# Altium PCB PCB_Main_Board_v2.0.PcbDoc (part 5 of 5)
Units mil, origin at the board's own origin, x right, y up, seen from the top; angles counter-clockwise.
Board outline 1967.5 x 1574.8 mil, 4 copper layers (Top Layer, Mid Layer 1, Mid Layer 2, Bottom Layer), stack 61.811 mil thick; 225 components, 129 nets, 854 pads, 286 vias.
Unrouted connection lines stored in the file: 2.
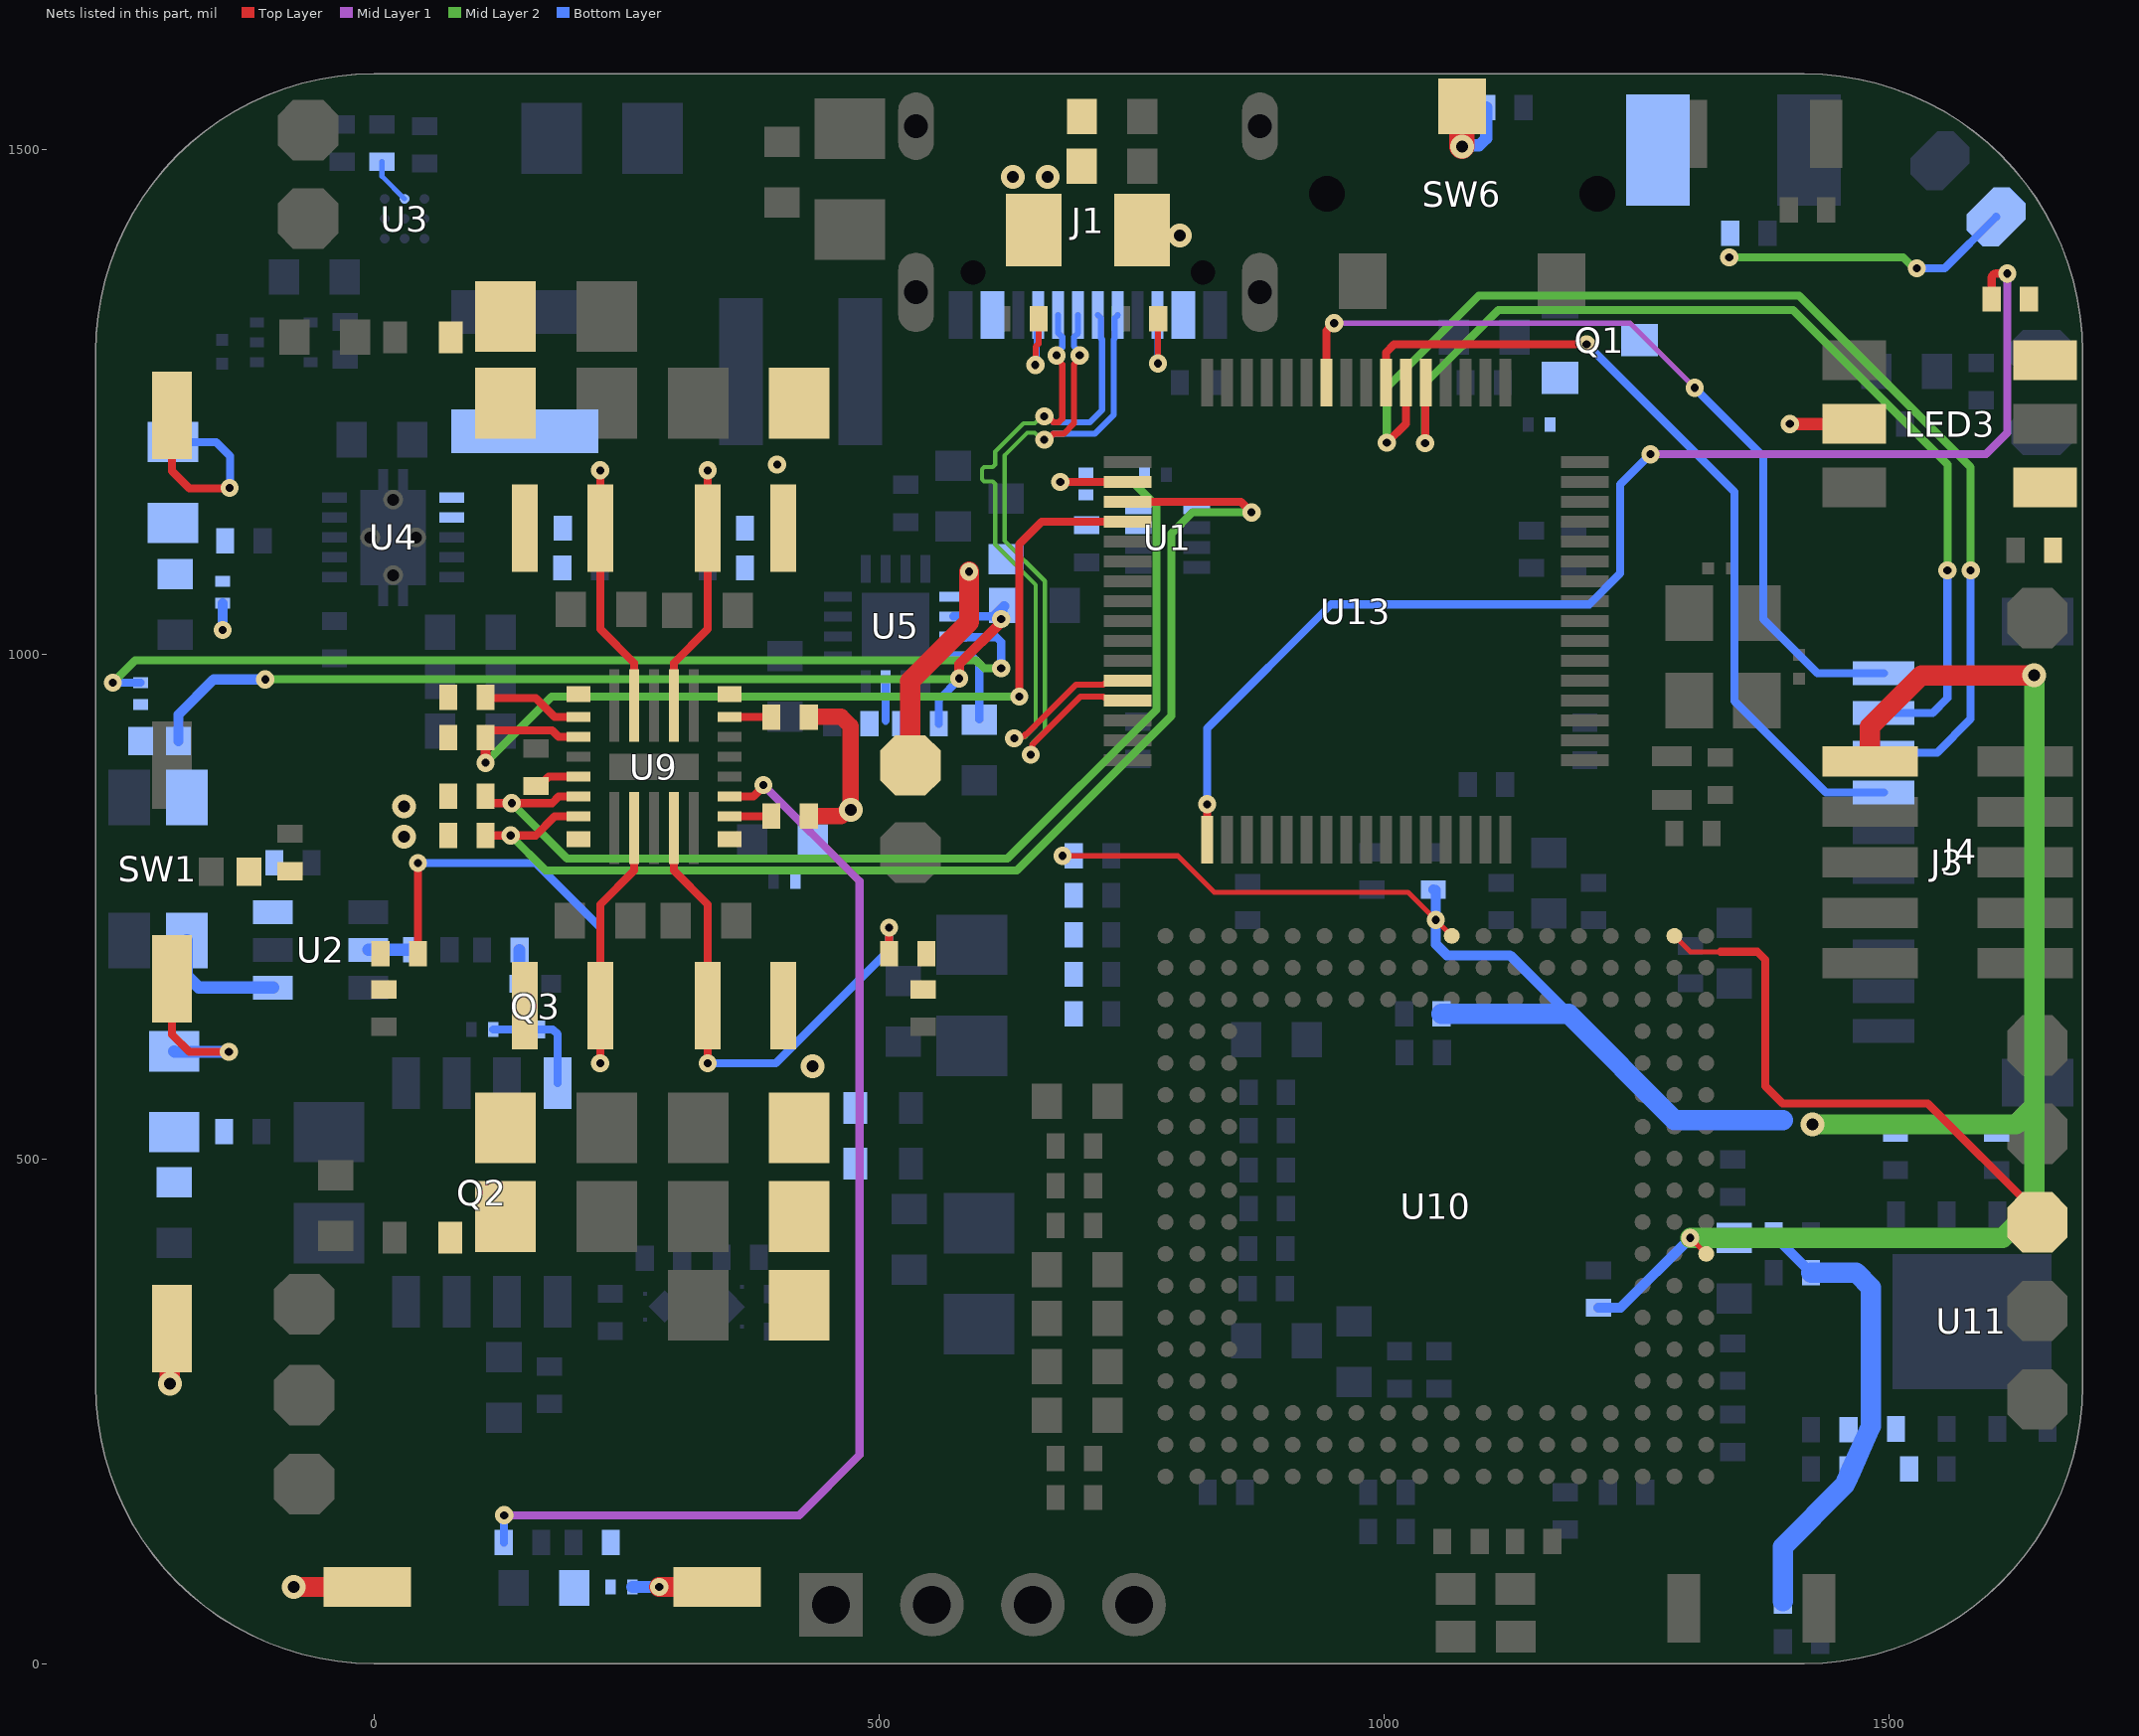
[diagram p5: the nets of this part, all layers, seen from the top]

## Via types
v1: diameter 18, hole 8, Top Layer to Bottom Layer, tented both sides, 224 vias
v2: diameter 23.62, hole 11.81, Top Layer to Bottom Layer, tented both sides, 59 vias
v3: diameter 19.68, hole 11.81, Top Layer to Bottom Layer, tented both sides, 3 vias

## Nets (pads, with @x,y where several pads share a name; then routed paths per layer and width w, separated by ;. In a path a pad name is that pad's centre, name@x,y a point inside that pad or via, vN(x,y) a via of type N, cw(c..) or ccw(c..) an arc to the next point about the centre after c; other vN are vias at no path point) (continued)
NetC107_1: C107.1 D1.2 Q1.3 TP3.2 | length 289.9
  Mid Layer 2 w8: v1(1342,1393) 1514.27,1393 1525.01,1382.26 v1(1527.71,1382.26)
  Bottom Layer w8: v1(1527.71,1382.26) 1529.35,1382.26 1529.53,1382.08 1555.25,1382.08 TP3.2@1606.24,1433.08
NetFB1_1: FB1.1 J1.A4/B9 J1.B4/A9 | length 38
  Top Layer w12: FB1.1@760.54,1420 782.1,1414.9 v2(797.99,1414.9)
NetJ1_A5: J1.A5 R1.2 | length 97.6
  Top Layer w6: v1(654.83,1286.52) 655.14,1286.82 655.14,1304.52 658.14,1307.52 R1.2@658.18,1332.11 R1.2@658.18,1332.11
  Bottom Layer w6: v1(654.83,1286.52) 656.31,1287.99 656.31,1334.42 J1.A5@657.79,1335.9
NetJ1_B5: J1.B5 R6.2 | length 92.2
  Top Layer w6: v1(776.25,1288) 776.25,1331.74 R6.2@776.62,1332.11
  Bottom Layer w6: J1.B5@775.9,1335.9 775.9,1288.65 v1(776.25,1288)
NetL1_2: L1.2 U4.1 U4.2
NetLED1_1: LED1.1 R2.1
NetLED2_2: LED2.2 R15.2
NetLED3_2: LED3.2 R59.1 | length 140.8
  Top Layer w12: v1(1402,1228) LED3.2@1465.89,1228
  Bottom Layer w8: v1(1402,1228) R59.1@1478.89,1228
NetLED3_4: LED3.4 R61.1
NetLED3_6: LED3.6 R60.1
NetQ1_1: Q1.1 R11.1
NetQ2_4: Q2.4 Q3.3 R38.1 | length 114.2
  Bottom Layer w8: R38.1@118,628.32 Q3.3@159.75,628.32 176.97,628.32 181.66,623.64 Q2.4@181.66,574.99
NetQ3_1: Q3.1 R39.1 | length 33.4
  Bottom Layer w12: Q3.1@144,673.6 R39.1@144,707
NetR4_2: R4.2 U2.3
NetR9_2: R9.2 U3.B1 | length 46.1
  Bottom Layer w5: R9.2@7.82,1487.78 7.82,1473.42 U3.B1@30.28,1450.96
NetR12_2: R12.2 U2.5 | length 43.2
  Bottom Layer w12: U2.5@-5.51,707.21 R12.2@37.66,707.21
NetR13_2: R13.2 U5.4 | length 84.5
  Bottom Layer w8: U5.4@573.51,998.03 592.21,998.03 599.3,990.94 R13.2@599.3,935.16
NetR45_1: R45.1 R46.1 R47.2
NetR46_2: R46.2 SW3.1 | length 83.9
  Top Layer w20: v1(282.46,76.09) SW3.1@339.68,76.09
  Bottom Layer w12: R46.2@255.83,76 255.91,76.09 v1(282.46,76.09)
NetR48_1: R48.1 R49.1 R50.2
NetR48_2: R48.2 SW4.1 | length 173
  Top Layer w8: SW4.1@-199.93,678.46 -199.93,623.09 -182.85,606.01 v1(-143.76,606.01)
  Bottom Layer w12: R48.2@-197.93,606.61 -197.32,606.01 v1(-143.76,606.01)
NetR54_1: R54.1 R55.1 R56.1 R57.2
NetR54_2: R54.2 SW5.1 | length 213.7
  Top Layer w8: SW5.1@-199.93,1236.63 -199.93,1181.25 -182.85,1164.18 v1@-143.36,1164.18
  Bottom Layer w5: v1@-143.36,1164.18 v1@-142.5,1165.03
  Bottom Layer w8: R54.2@-199,1210.11 -156.42,1210.11 -142.5,1196.2 v1@-142.5,1165.03
  other v1: -142.93,1164.6
NetR58_1: R58.1 SW6.2 | length 97.7
  Top Layer w25: v2(1077.28,1502.8) SW6.2@1077.28,1542.45
  Bottom Layer w12: v2(1077.28,1502.8) 1078.4,1503.92 1094.32,1503.92 1101.35,1510.95 R58.1@1101.35,1541.52
NetSW1_1: SW1.1 U2.1 | length 125.3
  Bottom Layer w12: SW1.1@-185.46,716.54 -185.46,681.62 -173.65,669.81 U2.1@-100,669.81
NetTP2_1: TP2.1 U10.V2 | length 579.3
  Top Layer w5: U10.V2@1287.68,720.98 1303.43,705.23 1333.5,705.23
  Top Layer w8: 1333.5,705.23 1369.93,705.23 1377.8,697.35 1377.8,572.13 1394.93,555 1538.68,555 1647.09,446.58 TP2.1@1647.09,437.11 ; TP2.1@1645.03,447.7 TP2.1@1661.57,431.16
PMIC_1V0: C37.2 C38.2 C39.2 FB3.1 FB4.1 L5.2 U9.1
  other v2: 434.03,592.02
PMIC_1V2: C35.2 C36.2 FB5.1 L4.2 U9.14
PMIC_1V8: C40.2 C41.2 FB2.1 L6.2 U9.21
PMIC_3V3: C34.2 C50.2 C51.2 C87.2 C88.2 C89.2 J3.1 L3.2 R28.2 R29.2 R30.2 R31.2 R32.2 R33.2 R34.2 R35.2 R36.2 R40.2 R41.2 R42.2 R56.2 SW3.2 SW4.2 U9.8 U10.H1 U10.V9 U11.8 | length 3181.6
  Top Layer w5: v1(681.86,800.28) 795.89,800.28 831.9,764.28 1023.91,764.28 v1(1051.47,736.72) U10.V9@1067.21,720.98 ; v1(1303.43,421.76) U10.H1@1319.18,406.01
  Top Layer w20: v2(-202.31,277.32) -202.31,328.24 -203,328.93 SW4.2@-199.93,332.01 ; v2(-79.37,76.09) SW3.2@-6.77,76.09 ; J3.1@1481.29,893.85 1481.29,928.17 1532.12,979 v2(1644,979)
  Mid Layer 2 w20: v1(1303.43,421.76) 1612.8,421.76 1644,452.96 1644,552.12 ; v2(1424.47,534.19) 1626.07,534.19 1644,552.12 ; v2(1644,979) 1644,552.12
  Bottom Layer w10: v1(-149.93,1023.85) R56.2@-149.93,1050.38 ; C89.2@1048.89,766.78 1051.47,766.53 v1(1051.47,736.72) 1051.47,712.6 1062.4,701.67 1124.85,701.67 1182.87,643.64 ; R33.2@1212.43,352.62 1234.29,352.62 v1(1303.43,421.76) 1346.86,421.76 C87.2@1347,421.62 1350.15,424.76 C88.2@1386,424.76 1386,424.26 R34.2@1423,387.27
  Bottom Layer w20: R28.2@1057.17,643.64 1182.87,643.64 1287.94,538.58 1395,538.58 ; R31.2@1395,62 1395,115.8 1456.2,177 1462.79,191.75 1477.32,224.26 1482.31,235.43 1482.31,372.71 1467.75,387.27 R34.2@1423,387.27
  other v1: 399.13,1187.72
PMIC_CLK: R44.2 U9.3 | length 1146
  Top Layer w8: U9.3@352.01,858.88 375.71,858.88 385.5,868.67 v1(385.5,870.41)
  Mid Layer 1 w8: v1(128.93,147.09) 420.83,147.09 480.73,206.99 480.73,775.19 v1(385.5,870.41)
  Bottom Layer w8: R44.2@128.5,120 128.71,120.21 128.71,146.87 v1(128.93,147.09)
PMIC_EN1: R23.1 U9.7 | length 41.5
  Top Layer w8: U9.7@352.01,937.62 393.23,937.62 R23.1@393.44,937.41
PMIC_EN2: R22.1 U9.15 | length 100.8
  Top Layer w8: R22.1@110.44,957.41 110.44,956.41 160.03,956.41 178.82,937.62 U9.15@202.41,937.62
PMIC_EN3: R21.1 U9.2 | length 41.6
  Top Layer w8: U9.2@352.01,839.2 393.1,839.2 R21.1@393.44,839.54
PMIC_NINT: R20.1 U9.19 U13.34 | length 1194.5
  Top Layer w8: R20.1@110.44,859.41 110.44,857.41 115.44,852.41 v1(136.4,852.41) 176.25,852.41 182.73,858.88 U9.19@202.41,858.88 ; v1(679.52,1170.57) U13.34@746.24,1170.57
  Mid Layer 2 w8: v1(136.4,852.41) 191.21,797.6 627.34,797.6 774.63,944.89 774.63,1147.18 751.25,1170.57 v1(679.52,1170.57)
PMIC_NRST: R19.1 U9.20 U13.35 | length 1227.8
  Top Layer w8: R19.1@110.44,820.41 v1(135.24,820.41) 160.03,820.41 178.82,839.2 U9.20@202.41,839.2 ; U13.35@746.24,1150.88 858.47,1150.88 v1(868.93,1140.42)
  Mid Layer 2 w8: v1(135.24,820.41) 170.05,785.6 636.62,785.6 789.68,938.66 789.68,1119.58 810.52,1140.42 v1(868.93,1140.42)
PMIC_PGOOD: R18.1 U9.16 U13.36 | length 938
  Top Layer w8: R18.1@115.44,924.41 176.25,924.41 182.73,917.94 U9.16@202.41,917.94 ; v1(639.03,957.96) 639.03,1109.17 661.06,1131.2 U13.36@746.24,1131.2
  Top Layer w10: v1(110.43,892.35) R18.1@110.44,917.41
  Mid Layer 2 w8: v1(110.43,892.35) 176.04,957.96 v1(639.03,957.96)
PMICVIO_3V3: R16.2 R17.2 R18.2 R19.2 R20.2 R21.2 R22.2 R23.2 | length 170.8
  Top Layer w16: R21.2@430.44,839.54 462.63,839.54 472,848.91 472,877 472,928.63 462.63,938 431.03,938 R23.2@430.44,937.41
  other v2: 29.94,819.07 472,846 29.94,849.41
PR1: R3.1 R5.2 U1.4
RED: R60.2 U13.49 | length 1272
  Top Layer w8: U13.49@824.98,816.24 v1(824.98,851.3) ; R60.2@1601.81,1351.69 1601.81,1372.43 cw(c1606.38,1372.43) 1606.38,1377 v1(1617.31,1377)
  Mid Layer 1 w8: v1(1264,1198) 1596,1198 1617.31,1219.31 v1(1617.31,1377)
  Bottom Layer w8: v1(824.98,851.3) 824.98,926.44 947.78,1049.24 1203.28,1049.24 1233.96,1079.92 1233.96,1167.96 v1(1264,1198)
REGN: C17.1 LED2.1 R10.2 U5.2 | length 1011
  Top Layer w10: v1(579.43,975.96) 579.43,990.06 621.99,1032.63 621.99,1034.79 v1(621.03,1034.79)
  Mid Layer 2 w8: v1(-107.76,975) 578.5,975.03 v1(579.43,975.96)
  Bottom Layer w8: R10.2@559.19,930.98 559.19,954.82 579.43,975.05 v1(579.43,975.96) ; U5.2@573.51,1037.4 C17.1@613.94,1037.4
  Bottom Layer w10: LED2.1@-193.6,914 -193.6,940.26 -158.86,975 v1(-107.76,975) ; C17.1@613.94,1037.4 C17.1@623.94,1047.4 ; v1(621.03,1034.79) 621.99,1034.79 C17.1@621.99,1045.45
SPI_CLK2: J4.2 U13.21 | length 1030.6
  Top Layer w8: v1(1040.82,1209.01) 1041.17,1209.36 1041.17,1268.64 U13.21@1041.52,1268.99
  Mid Layer 2 w8: v1(1040.82,1209.01) 1040.82,1268.3 1113.25,1340.73 1405.3,1340.73 1558.09,1187.93 v1@1558.09,1083.03
  Bottom Layer w8: J4.2@1495,941.88 1543.39,941.88 1558.06,956.56 v1(1558.06,1083)
SPI_MISO2: J4.3 U13.22 | length 1157.5
  Top Layer w8: v1(1002.93,1209.36) 1021.84,1228.26 U13.22@1021.84,1268.99
  Mid Layer 2 w8: v1(1002.93,1209.36) 1002.93,1263.96 1093.97,1355 1411.21,1355 1581.06,1185.15 v1(1581.06,1083)
  Bottom Layer w8: J4.3@1495,902.51 1547.87,902.51 1581.06,935.7 v1(1581.06,1083)
SPI_MOSI2: J4.4 U13.23 | length 830.9
  Top Layer w8: U13.23@1002.15,1268.99 1002.15,1298.78 1010.15,1306.78 v1(1200.79,1306.78)
  Bottom Layer w8: v1(1200.79,1306.78) 1347,1160.57 1347,953.67 1437.53,863.14 J4.4@1495,863.14
SPI_SS2: J4.1 U13.26 | length 844
  Top Layer w8: U13.26@943.1,1268.99 943.1,1320.09 v1(950.79,1327.78)
  Mid Layer 1 w5: v1(950.79,1327.78) 1243.79,1327.78 v1(1307.79,1263.78)
  Bottom Layer w8: v1(1307.79,1263.78) 1375.79,1195.78 1375.79,1034.78 1429.32,981.25 J4.1@1495,981.25
STAT: R15.1 U5.3 | length 997.3
  Mid Layer 2 w8: v1(-258.72,971.83) -236.59,993.96 596.28,993.96 604.28,985.96 v1(621.03,985.96)
  Bottom Layer w8: v1@-260.04,971.83 v1(-258.72,971.83) R15.1@-231,971.83 ; U5.3@573.51,1017.71 574.43,1016.79 616.35,1016.79 621.03,1012.1 v1(621.03,985.96)
SW0: L3.1 R24.2 U9.10 | length 304.2
  Top Layer w8: U9.10@296.9,949.04 296.9,991.22 330.42,1024.74 L3.1@330.42,1124.82 330.37,1124.87 v1(330.37,1182.07)
  Bottom Layer w5: R24.2@330.37,1124.82 v1(330.37,1182.07)
SW0_CAP: C42.2 R24.1
SW1: L4.1 R25.2 U9.12 | length 304.3
  Top Layer w8: v1(223.94,1182.07) 223.94,1124.87 L4.1@224,1124.82 224,1024.74 257.53,991.22 U9.12@257.53,949.04
  Bottom Layer w5: v1(223.94,1182.07) v1(223.94,1182.07) R25.2@224,1124.82
SW1_CAP: C43.2 R25.1
SW2: L5.1 R26.2 U9.25 | length 520.6
  Top Layer w8: U9.25@296.9,827.78 296.9,785.6 330.42,752.07 L5.1@330.42,652 v1(330.42,594.8) ; R26.2@510,703.41 v1(510,729.05)
  Bottom Layer w8: v1(330.42,594.8) 397.71,594.8 510,707.1 v1(510,729.05)
SW2_CAP: C44.2 R26.1
SW3: L6.1 R27.2 U9.23 | length 678.1
  Top Layer w8: R27.2@43.44,703.41 v1@43.44,793.17 ; v1(224,594.8) L6.1@224,652 224,752.07 257.53,785.6 U9.23@257.53,827.78
  Bottom Layer w8: v1(43.44,793.17) 160.08,793.17 204.6,748.65 224,729.25 v1(224,594.8)
SW3_CAP: C45.2 R27.1
TS: R10.1 R14.2 U5.7 | length 36.4
  Bottom Layer w8: 506.58,934.08 U5.7@506.58,970.47
USB_N: J1.A7 J1.B7 U13.44 | length 826.1
  Top Layer w6: v1(633.92,916.69) 635.66,918.43 643.09,918.43 645.1,920.44 645.81,920.44 694.99,969.62 722.11,969.62 723.29,970.81 743.34,970.81 U13.44@746.24,973.72 ; v1(663.69,1235.5) 666.94,1235.5 672.69,1229.75 678.05,1229.75 681.57,1233.27 681.57,1286.93 675.82,1292.68 v1(675.82,1295.93)
  Mid Layer 2 w4.2: v1(633.92,916.69) 635.67,918.43 645.42,918.43 655.14,928.15 655.14,1068.59 615.12,1108.61 615.12,1166.52 615.12,1168.62 612.66,1171.09 604.08,1171.09 601.95,1173.22 601.95,1183.16 604.08,1185.29 612.66,1185.29 615.12,1187.75 615.12,1200.6 643.13,1228.6 654.33,1228.6 661.23,1235.5 v1(663.69,1235.5)
  Bottom Layer w6: v1(663.69,1235.5) 666.94,1235.5 672.69,1229.75 708.94,1229.75 720.94,1241.74 720.94,1311.76 719.75,1312.95 719.75,1332.99 J1.A7@716.84,1335.9 ; v1(675.82,1295.93) 675.82,1298.28 681.57,1304.03 681.57,1314.09 677.47,1318.18 J1.B7@677.47,1335.9
USB_P: J1.A6 J1.B6 U13.45 | length 826.1
  Top Layer w6: v1(650.19,900.43) 651.92,902.16 651.92,910.3 699.75,958.12 722.11,958.12 723.29,956.94 743.34,956.94 U13.45@746.24,954.03 ; v1(663.69,1212.5) 666.94,1212.5 672.69,1218.25 682.81,1218.25 693.07,1228.5 693.07,1286.93 698.82,1292.68 v1(698.82,1295.93)
  Mid Layer 2 w4.2: v1(650.19,900.43) 651.93,902.17 651.93,911.92 664.34,924.33 664.34,1072.4 624.32,1112.42 624.32,1196.78 646.94,1219.4 654.33,1219.4 661.23,1212.5 v1(663.69,1212.5)
  Bottom Layer w6: v1(663.69,1212.5) 666.94,1212.5 672.69,1218.25 713.71,1218.25 732.44,1236.98 732.44,1311.76 733.62,1312.95 733.62,1332.99 J1.B6@736.53,1335.9 ; J1.A6@697.16,1335.9 697.16,1318.18 693.07,1314.09 693.07,1304.93 698.82,1299.18 v1(698.82,1295.93)
V_OR: C33.1 U9.18 | length 45.8
  Top Layer w8: C33.1@160.44,869.41 163.94,869.41 173.1,878.57 U9.18@202.41,878.57
V_USB: C1.1 C2.2 C3.2 C12.1 FB1.2 R3.2 TP5.1 U1.3 U1.5 U5.1 | length 231.2
  Top Layer w6: v2@625.9,1475.9 636.42,1475.9 v2@639.68,1472.63
  Top Layer w20: TP5.1@531,889.81 531,973.51 589.26,1031.77 v1(589.26,1081.77)
  other v2: 632.68,1472.63 667.18,1472.63
pads on no net: J1.A8 J1.B8 J1.MH J3.7 J4.7 SW6. U1.8 U2.4 U4.5 U4.8 U5.5 U5.6 U5.8 U6.3 U9. U10.A3 U10.A4 U10.B3 U10.B4 U10.B5 U10.C3 U10.C4 U10.C5 U10.C9 U10.C10 U10.L1 U10.L2 U10.M1 U10.N1 U10.N2 U10.P1 U10.P2 U10.P17 U10.P18 U10.R1 U10.R2 U10.R18 U10.T1 U10.T2 U10.T18 U10.U3 U10.U4 U10.U5 U10.U6 U10.U7 U10.V3 U10.V5 U13.2 U13.28 U13.30 U13.40 U13.51 U13.52 U13.53 U13.54 U13.56 U13.57 U13.61

## Polygon pours and split planes (outlines as drawn)
GND on Top Layer "GND_L01_P053" (solid, remove dead copper, pour order 53): -275.59,275.59 -275.59,1299.21 cw(c0,1299.21) 0,1574.8 -1,1574.8 1416.32,1574.8 cw(c1416.32,1299.21) 1691.91,1299.21 1691.91,275.59 cw(c1416.32,275.59) 1416.32,0 -1,0 0,0 cw(c0,275.59)
BATT on Top Layer "BATT_L01_P079" (solid, remove dead copper, pour order 79): 1606.39,1480.06 1645.32,1441.13 1645.32,1393 1641.32,1389 1575.44,1389 1575.44,1466.84 1591.35,1482.75
NetFB1_1 on Top Layer "NETFB1_1_L01_P074" (solid, remove dead copper, pour order 74): 732.98,1455.83 732.98,1384.18 815,1384.18 815,1455.83
PMIC_3V3 on Top Layer "PMIC_3V3_L01_P028" (solid, remove dead copper, pour order 28): 333.46,983.65 333.46,952.39 375.04,952.39 402.72,980.07 489.98,980.07 489.98,1383 359.86,1383 359.86,1077.51 434.98,1077.51 434.98,1010.05 359.86,1010.05
PMIC_3V3 on Top Layer "PMIC_3V3_L01_P072" (solid, remove dead copper, pour order 72): -252,232.42 ccw(c-152,232.42) -222.71,161.71 -178.99,116.01 -127.14,64.15 ccw(c-64,127.29) -64,38 37,38 37,106 39,126 37,124 -97.5,124 -180.24,206.74 -180.24,822.07 -139.93,822.07 -139.93,1074.61 -252,1074.61
AR_1P0_RF2 on Top Layer "AR_1P0_RF2_L01_P015" (solid, remove dead copper, pour order 15): 854.61,413.89 854.61,366.79 752.7,366.79 752.7,275.59 701.44,275.59 701.44,413.89
AR_1P0_RF1 on Top Layer "AR_1P0_RF1_L01_P016" (solid, remove dead copper, pour order 16): 752.7,627.24 663.25,627.24 623.89,587.89 701.44,587.89 701.44,419.26 752.7,419.26 752.7,519.65
GND on Top Layer "Top Layer-GND" (solid, remove dead copper, pour order 9): 250.45,750.6 239.42,750.6 239.42,659.23 239.42,606.32 203.42,570.32 203.42,307 354.11,307 354.11,566.24 314.42,605.93 314.42,658.61 314.42,750.6 304.34,750.6 294.41,760.53 282.13,773.01 282.13,862.54 272.29,862.54 272.29,772.44
BATT on Top Layer "BATT_L01_P054" (solid, remove dead copper, pour order 54): 37.5,1373.48 37.52,1373.46 100.31,1373.46 100.31,1548.84 45.62,1548.84 -101.16,1548.84 -113,1537 -113,1475 9.07,1475.28 9.07,1373.54
PMICVIO_3V3 on Top Layer "PMICVIO_3V3_L01_P064" (solid, remove dead copper, pour order 64): 82.44,969.91 82.44,807.91 9.94,807.91 9.94,969.91
PMIC_1V0 on Top Layer "PMIC_1V0_L01_P031" (solid, remove dead copper, pour order 31): 328.54,793.17 328.54,824.43 370.12,824.43 397.8,796.75 485.06,796.75 485.06,370.94 485.06,307 385.5,307 385.5,699.31 430.06,699.31 430.06,766.77 354.94,766.77
5V_IN on Top Layer "5V_IN_L01_P010" (solid, remove dead copper, pour order 10): 311.66,863.61 311.66,785.66 343.82,753.5 343.82,704.61 421,704.61 421,718.94 421,762.12 356.01,762.12 321.5,796.63 321.5,863.61
PMIC_1V2 on Top Layer "PMIC_1V2_L01_P027" (solid, remove dead copper, pour order 27): 220.96,983.65 220.96,952.39 179.38,952.39 151.7,980.07 64.44,980.07 64.19,1383 164,1383 164,1077.51 119.44,1077.51 119.44,1010.05 194.56,1010.05
GND on Top Layer "Top Layer-GND" (solid, pour order 8): 303.97,1026.22 315,1026.22 315,1210.57 351,1210.57 351,1383 200.31,1383 200.31,1210.57 240,1210.57 240,1118.21 240,1026.22 250.08,1026.22 260.01,1016.29 272.29,1003.81 272.29,914.28 282.13,914.28 282.13,1004.37
PMIC_1V8 on Top Layer "PMIC_1V8_L01_P029" (solid, remove dead copper, pour order 29): 220.96,793.17 220.96,824.43 179.38,824.43 151.7,796.75 64.44,796.75 64.44,396.26 63,394.82 64,393.82 164,393.82 164,699.31 119.44,699.31 119.44,766.77 194.56,766.77
GND on Top Layer "GND_L01_P017" (solid, remove dead copper, pour order 17): 692.7,574.76 692.7,519.65 692.7,152.17 641.44,152.17 641.44,574.76
AR_1V8 on Top Layer "AR_1V8_L01_P014" (solid, remove dead copper, pour order 14): 794.52,263.76 794.52,248.95 754.22,208.65 754.22,152.17 702.96,152.17 702.96,263.76
5V_IN on Top Layer "5V_IN_L01_P013" (solid, pour order 13): 242.76,913.21 242.76,991.16 210.6,1023.32 210.6,1072.21 133.42,1072.21 133.42,1057.88 133.42,1014.7 198.41,1014.7 232.92,980.19 232.92,913.21
5V_IN on Top Layer "5V_IN_L01_P012" (solid, pour order 12): 311.66,913.21 311.66,991.16 343.82,1023.32 343.82,1072.21 421,1072.21 421,1057.88 421,1014.7 356.01,1014.7 321.5,980.19 321.5,913.21
5V_IN on Top Layer "5V_IN_L01_P011" (solid, pour order 11): 242.76,863.61 242.76,785.66 210.6,753.5 210.6,704.61 133.42,704.61 133.42,718.94 133.42,762.12 198.41,762.12 232.92,796.63 232.92,863.61
GND on Bottom Layer "GND_L04_P052" (solid, remove dead copper, pour order 52): -275.59,275.59 -275.59,1299.21 cw(c0,1299.21) 0,1574.8 -1,1574.8 1416.32,1574.8 cw(c1416.32,1299.21) 1691.91,1299.21 1691.91,275.59 cw(c1416.32,275.59) 1416.32,0 -1,0 0,0 cw(c0,275.59)
3V3 on Bottom Layer "3V3_L04_P059" (solid, remove dead copper, pour order 59): 783.04,1295.93 1032.39,1295.93 1032.39,1419.9 1319.55,1419.83 1319.55,816.28 734.74,816.28 734.74,1202.11 783.03,1202.11
3V3_LDO on Bottom Layer "3V3_LDO_L04_P051" (solid, remove dead copper, pour order 51): 1515.53,1459.58 1579.73,1459.58 1579.73,1518.54 1452.66,1518.54 1452.66,1554.58 1371,1553.98 1371,1008.81 1515.53,1008.81
BAT+ on Bottom Layer "BAT+_L04_P039" (solid, remove dead copper, pour order 39): 309.91,1359.59 309.91,1545.91 247.38,1545.91 247.38,1461 232.72,1461 76.27,1461 76.27,1311.77 -74.08,1311.77 -74.08,1149.95 -26.95,1149.95 -26.95,1176.7 -7.08,1176.7 -7.08,1261 264.31,1261 264.31,1198.88 389.45,1198.88 389.45,983.03 434.98,983.03 434.98,1359.59
5V_BST on Bottom Layer "5V_BST_L04_P044" (solid, remove dead copper, pour order 44): 64.79,1090.89 108.07,1090.89 108.07,877 151.7,877 151.7,1120.82 64.79,1120.82
PMIC_1V0 on Bottom Layer "PMIC_1V0_L04_P070" (solid, remove dead copper, pour order 70): 488.25,616.16 488.25,478.39 397.71,478.39 397.71,616.16
PMICVIO_3V3 on Bottom Layer "PMICVIO_3V3_L04_P065" (solid, remove dead copper, pour order 65): 494,855.54 354.29,855.54 354.29,885.49 9.08,885.49 9.08,807.91 50.51,807.91 50.51,830.71 411.94,830.71 411.94,767.72 494,767.72
AR_1P0_RF2 on Bottom Layer "AR_1P0_RF2_L04_P038" (solid, pour order 38): 843.72,379.74 844.88,378.58 844.88,299.03 883.9,299.03 883.9,463.26 843.72,463.26 843.72,521.26 504.91,521.26 504.91,435.53 560.41,435.53 560.41,379.74
V_USB on Bottom Layer "V_USB_L04_P047" (solid, remove dead copper, pour order 47): 827.87,1138.68 789.68,1138.68 789.68,1118.99 668.94,1118.99 668.94,1075.08 595.93,1075.08 595.93,1052.16 559.73,1052.16 559.73,1077.51 579.43,1077.51 579.43,1109.08 653.94,1109.08 653.94,1163.19 727.03,1163.19 727.03,1131.59 779.25,1131.59 779.25,1151.27 827.87,1151.27
AR_1V8 on Bottom Layer "AR_1V8_L04_P060" (solid, remove dead copper, pour order 60): 1070.46,294.03 1070.46,263.53 1004.98,263.53 1004.98,216.69 754.22,216.69 754.22,294.03 952.97,294.03
AR_1V8 on Bottom Layer "AR_1V8_L04_P058" (solid, remove dead copper, pour order 58): 779.04,635.5 883.9,635.5 883.9,473.02 853.48,473.02 853.48,534.97 779.5,534.97
5V_IN on Bottom Layer "5V_IN_L04_P019" (solid, remove dead copper, pour order 19): 279.31,385.49 279.31,368.46 267.97,357.12 203.42,357.12 203.42,283 9,283 9,385.49
NetC107_1 on Bottom Layer "NETC107_1_L04_P050" (solid, remove dead copper, pour order 50): 1352,1566.3 1352,1294.86 1234.89,1294.86 1234.89,1567.15
NetFB1_1 on Bottom Layer "NETFB1_1_L04_P046" (solid, remove dead copper, pour order 46): 815,1312.27 788.1,1312.27 788.1,1384.18 624.32,1384.18 624.32,1312.27 600.7,1312.27 600.7,1455.83 815,1455.83
GND on Bottom Layer "GND_L04_P045" (solid, remove dead copper, pour order 45): 52.92,1229.93 52.92,1059.2 80.51,1059.2 80.51,906.35 -13.56,906.35 -13.56,1162.94 4.16,1162.94 4.16,1229.93
NetL1_2 on Bottom Layer "NETL1_2_L04_P043" (solid, remove dead copper, pour order 43): 64.79,1130.26 64.79,1242.19 221.94,1242.19 221.94,1198.88 100.92,1198.88 100.92,1130.26
NetC13_2 on Bottom Layer "NETC13_2_L04_P040" (solid, pour order 40): 451.08,1070.86 511.5,1070.86 511.5,1158.74 540,1158.74 540,1262.31 503.14,1262.31 503.14,1359.59 451.08,1359.59
AR_1P0_RF1 on Bottom Layer "AR_1P0_RF1_L04_P035" (solid, pour order 35): 648.26,643.74 681.26,610.74 752.7,610.74 752.7,532.53 504.5,532.53 504.5,643.24 504,643.74
1V8_LDO on Bottom Layer "1V8_LDO_L04_P034" (solid, remove dead copper, pour order 34): 403.57,351.73 431.21,351.73 431.21,325.62 431.21,316.62 355.53,316.62 355.53,334.22 373.03,351.73
5V_IN# on Bottom Layer "5V_IN#_L04_P032" (solid, remove dead copper, pour order 32): 145.44,549.4 145.44,606.32 104.9,606.32 104.9,681.62 -25.2,681.62 -25.2,584.26 9.66,549.4
3V3_LDO on Bottom Layer "3V3_LDO_L04_P020" (solid, remove dead copper, pour order 20): 344.59,370.14 358.37,370.14 366.25,362.27 370.19,362.27 370.19,379.2 362.69,386.69 362.69,415.12 287,415.12 287,378.09 304.51,360.59 335.04,360.59
GND on Mid Layer 2 "GND_L03_P075" (solid, remove dead copper, pour order 75): -275.59,275.59 -275.59,1299.21 cw(c0,1299.21) 0,1574.8 -1,1574.8 1416.32,1574.8 cw(c1416.32,1299.21) 1691.91,1299.21 1691.91,275.59 cw(c1416.32,275.59) 1416.32,0 -1,0 0,0 cw(c0,275.59)
5V_BST on Mid Layer 2 "5V_BST_L03_P062" (solid, remove dead copper, pour order 62): 55.5,779.37 55.5,740.53 723.13,740.53 723.13,779.37 1002.93,779.37 1002.93,1098.89 896.59,1098.89 896.59,944.85 55.5,944.85
AR_1P2 on Mid Layer 2 "AR_1P2_L03_P056" (solid, remove dead copper, pour order 56): 1130.21,180.62 -194.87,180.62 -194.87,930.73 -193.6,932 -1,932 -1,748.15 -119.69,748.15 -119.69,263.76 263.76,263.76 748.42,748.42 1100.09,753.85 1100.09,732.48 1053.58,685.97 941.23,685.97 941.23,471.69 1315.66,468.3 1316.37,469 1438,469 1438,440.57 1315.69,441.08 1315.69,336.21 1315.7,323.1 1315.7,180.62
5V_IN# on Mid Layer 2 "5V_IN#_L03_P068" (solid, remove dead copper, pour order 68): 711.47,331.6 -89.44,331.6 -89.44,729.05 711.47,729.05
BATT on Mid Layer 2 "BATT_L03_P080" (solid, remove dead copper, pour order 80): 1645.32,1440 1437.86,1440 1437.86,1522.91 116.96,1522.91 23.29,1429.23 23.29,1324.16 1645.32,1324.16
GND on Mid Layer 1 "GND_L02_P076" (solid, remove dead copper, pour order 76): -275.59,275.59 -275.59,1299.21 cw(c0,1299.21) 0,1574.8 -1,1574.8 1416.32,1574.8 cw(c1416.32,1299.21) 1691.91,1299.21 1691.91,275.59 cw(c1416.32,275.59) 1416.32,0 -1,0 0,0 cw(c0,275.59)
PMIC_3V3 on Mid Layer 1 "PMIC_3V3_L02_P073" (solid, remove dead copper, pour order 73): -125.76,1074.61 -125.76,270 393.27,270 393.27,1262.31 705.62,1262.31 705.62,919.34 1555.28,919.34 1555.28,1035.81 1691.91,1035.81 1691.91,275.59 cw(c1416.32,275.59) 1416.32,0 -1,0 0,0 cw(c0,275.59) -275.59,275.59 -275.59,1074.61
V_USB on Mid Layer 1 "V_USB_L02_P069" (solid, remove dead copper, pour order 69): 685.62,1494.95 720.34,1494.95 720.34,1075.08 608.22,1075.08 608.22,857.82 536.73,857.82 536.73,1418 612.51,1418 612.51,1494.63
AR_1V8 on Mid Layer 1 "AR_1V8_L02_P067" (solid, remove dead copper, pour order 67): 1434.41,708.81 1462.5,708.81 1462.5,207.96 750.5,207.96 750.5,753.85 1154,753.85 1154,276.33 1391.67,276.33 1391.67,706.75
3V3 on Mid Layer 1 "3V3_L02_P061" (solid, remove dead copper, pour order 61): 726.73,1443.11 726.73,1504.44 600.7,1504.44 600.7,1443.11 76.27,1443.11 76.27,1567 907.7,1567 907.7,1190.25 726.73,1190.25
5V_BST on Mid Layer 1 "5V_BST_L02_P063" (solid, remove dead copper, pour order 63): -195.71,1087.22 -119.63,1087.22 -119.63,867 151.7,867 151.7,1398.28 14.51,1398.28 14.51,1475 -195.71,1475
5V_IN on Mid Layer 1 "5V_IN_L02_P066" (solid, remove dead copper, pour order 66): -61.76,275.59 -61.76,837.41 151.7,837.41 151.7,1042.68 388.51,1042.68 388.51,772.44 465.25,772.44 465.25,275.59

## Other copper
Top Layer:
  region net NetLED3_4: 1685.93,1184.69 1639.43,1184.69 1639.43,1084.63 1685.93,1084.63
  rectangle net 3V3_LDO: 1434.4,1096 1497.39,1184.69
  region net NetLED3_6: 1669.87,1364.19 1623.37,1364.19 1623.37,1271.32 1669.87,1271.32
  rectangle net NetC100_2: 858.82,1312.28 901.76,1569.91
  rectangle net NetC100_2: 511.51,1312.28 554.44,1569.91
  rectangle net NetC100_2: 386.5,1490.4 554.44,1569.91
  rectangle net V_USB: 615,1383.57 715.98,1555.76
  rectangle net NetFB1_1: 732.98,1384.18 788.1,1455.83
  rectangle net AR_1P2: -33.76,1296.5 32.69,1334.54
  rectangle net NetLED1_1: -136.01,770.4 -67.26,798.75
  rectangle net AR_1V8: -111.5,406.25 32.25,454
  rectangle net SW3_CAP: -2.56,658.91 26.07,720.41
  rectangle net SW2_CAP: 531.37,658.91 560,720.41
  region net GND: 1393.87,1013.15 1393.87,1090.92 1338.91,1090.92 1338.91,1013.15
  region net NetC106_2: 1327.09,1013.15 1327.09,1090.92 1272.13,1090.92 1272.13,1013.15
  rectangle net NetC101_2: 1345.84,926.54 1416.91,981.5
  rectangle net GND: 1315.5,809.9 1345.5,869.56
  rectangle net NetC93_1: 1264.06,809.9 1304.69,869.56
Bottom Layer:
  rectangle net 1V8_LDO: 1464.49,589 1527,638.73
  rectangle net BATT: 1532.57,1269.97 1681.31,1362.06
  rectangle net BATT: 145.91,1475 221.94,1549.91
  rectangle net SW1_CAP: 177.6,1072.95 195.6,1137.32
  rectangle net SW0_CAP: 358.32,1072.95 376.32,1137.32
  rectangle net GND: 655.14,1027.08 687.44,1065.58
  rectangle net GND: 687.44,1027.08 718,1099.77
  rectangle net PMIC_3V3: 670.32,785.28 693,812.78
  rectangle net PMIC_3V3: 684,631.24 702,812.78
  rectangle net AR_WARMRST: 711.5,627.74 742.5,659.74
  rectangle net AR_NERRIN: 711.5,666.88 742.5,698.88
  rectangle net AR_SYNC_OUT: -120.5,514.5 -97.14,574.99
  rectangle net PMIC_3V3: 1386,517.08 1462.5,555
  rectangle net AR_QSPI_CS: 1498.45,432.43 1519.14,498.08
  rectangle net AR_QSPI_CS: 1462.5,458.39 1519.14,498.08
  rectangle net PMIC_3V3: 1386,517.08 1619.28,538.58
  rectangle net 5V_IN: 388.51,718.94 494.22,750.79
  rectangle net 5V_IN: 379.82,743.05 548.5,762.68
  rectangle net 5V_IN: 377.82,718.94 400.97,782.29
  rectangle net NetR4_2: -130.97,732.8 -80.31,809.21
  rectangle net 3V3: 1050.39,1222.39 1090.42,1357.03
  rectangle net GND: 1109.48,1294.58 1151.39,1333.78
  rectangle net GND: 1108.89,1332.26 1192.37,1364.54
  rectangle net GND: 1104.89,1200.99 1126.89,1364.54
  rectangle net NetQ1_1: 1156.15,1217.39 1192.37,1289.74
  rectangle net 5V_IN#: 743.62,1099.31 827.87,1111.91
  rectangle net PR1: 697.72,1174.21 768.23,1186.74
  rectangle net PR1: 742.56,1138.68 770,1186.74
  region net NetC100_2: 519.01,1569.91 519.01,1489.44 894.99,1489.44 894.99,1569.91
  rectangle net NetR54_1: -214.5,1063.5 -138.43,1124.91
  rectangle net NetR54_1: -224,1063.5 -174,1150.11
  rectangle net LATCH/SP_EN: -156.42,1281.93 -108.9,1294.31
  rectangle net TS: 481.62,918.48 531.19,943.48
  rectangle net NetLED2_2: -243.2,899.83 -218.79,955.49
  rectangle net GND: -263.21,688.98 -221.87,885.83
  rectangle net NetSW1_1: -206.13,688.98 -164.79,885.83
  rectangle net NetR48_1: -222.93,462 -139.5,546.61
  rectangle net NetR45_1: 183.46,57.59 243.5,92.59
  rectangle net NetR45_1: 216.46,57.59 243.5,132.5
  rectangle net AR_PMIC_CLKOUT: 156.5,107.5 206.5,166
  region net AR_QSPI_D3: 1569.5,245.43 1544.47,245.43 1544.47,149 1569.5,149
  rectangle net PMIC_3V3: 1451,169.8 1529,245.43

## Silkscreen, mask and mechanical layers (free items; w line width, h text height)
Top Overlay:
  lines w5: 1360.09,1086.24 1398.32,1086.24 1393.32,1081.24 ; 1393.09,1081.24 1393.09,1091.47 1398.09,1086.47
  lines w6: 275,307 468.46,307 468.46,579 275,579 275,307 ; 372,125.26 477,125.26 477,281.26 372,281.26 372,125.26
  text "BATT" at -24.14,1503.93 h40
  text "5V_BST" at -23.85,1411.99 h40
  text "3V3" at 1525.27,1013.1 h50
  text "&" at 26.39,942.67 h38
  text "@" at 147.51,930.59 h30
  text "&" at 379.39,886.31 h38
  text "VBUS" at 572.2,873.53 h40
  text "&" at 379.39,788.29 h38
  text "5V_IN" at 572.19,784.47 h40
  text "5V" at -268.5,765.25 h40
  text "1V8" at 1539.7,596.88 h40
  text "*" at 280,556.32 h80
  text "@" at 631,505.44 h30
  text "SYNC_IN" at 1447.99,505.21 h40
  text "@" at 631,466.19 h30
  text "@" at 631,426.94 h30
  text "NETTP2_1" at 1430.41,416.69 h40
  text "5V_IN#" at -28.67,335.97 h40
  text "MCUCLKOUT" at 1371.8,330.13 h40
  text "SYNC_OUT" at -28.7,246.42 h40
  text "OCS_CLKOUT" at 1355.23,242.21 h40
  text "*" at 339,226.58 h80
  text "@" at 631,195.97 h30
  text "PMIC_CLKOUT" at -28.52,158.42 h40
  text "@" at 631,157.35 h30
Bottom Overlay:
  lines w5: 152.56,200.17 157.56,195.17 157.56,205.4 ; 157.33,205.4 152.33,200.4 173.97,200.4 ; 174,200 174,244.86 ; 357.12,775.37 362.12,780.37 362.12,770.14 ; 361.89,770.14 356.89,775.14 379.79,775.14 ; 661.1,1172.7 671.33,1172.7 666.33,1177.7 ; 661.1,1172.93 666.1,1177.93 666.1,1130.7 681,1130.7 ; 670.32,824.01 670.32,620.01 750.5,620.01 750.5,824.01 671.32,824.01 ; 843.31,348.03 923.48,348.03 923.48,589.75 844.31,589.75 ; 843.31,348.36 843.31,589.75 ; 1191.62,826.31 1297.19,826.31 ; 1291.79,809.65 1296.79,804.65 1296.79,826.28 ; 1291.79,809.88 1302.02,809.88 1297.02,804.88
  text "&" at 23.36,1540.1 h38
  text "&" at 1185.4,1526.34 h38
  text "+VE" at 1547.97,1525.61 h25 r45
  text "-VE" at 1658.21,1414.45 h25 r45
  text "MOTOR" at 1567.73,1374.28 h30 r315
  text "+VE" at 1674.59,1328.67 h25
  text "BATT" at 1616.85,1310.68 h30
  text "-VE" at 1674.59,1166.65 h25
  text "&" at -130.38,1131.23 h38
  text "SS" at 1457.49,971.69 h30
  text "CLK" at 1457.49,932.4 h30
  text "BATT" at -76.88,895.28 h40
  text "MISO" at 1457.49,892.06 h30
  text "&" at 470.55,880.82 h38
  text "&" at 539.55,880.82 h38
  text "MOSI" at 1457.49,854.69 h30
  text "@" at 1001.22,827.96 h30
  text "@" at 1061.89,827.96 h30
  text "&" at 699.87,826.83 h38
  text "IINT" at 1457.49,813.96 h30
  text "&" at -48.71,812.03 h38
  text "@" at 878.45,797.96 h30
  text "@" at 1128.3,797.68 h30
  text "3V3" at 1457.49,695.86 h30
  text "GND" at 1457.49,661.09 h30
  text "@" at 1316.18,636.17 h30
  text "&" at 1005.2,627.53 h38
  text "1V8" at 1457.49,617.55 h30
  text "@" at 837.31,569.09 h30
  text "&" at 1487.61,508.82 h38
  text "&" at 1587.61,508.82 h38
  text "&" at -131.45,476.82 h38
  text "@" at 1466.72,417.44 h30
  text "&" at 1193.67,372.9 h38
  text "&" at 1469.72,372.29 h38
  text "NOTE:" at -187.06,354.45 h30
  text "@" at 1028.46,332.94 h30
  text "@" at 1067.46,332.94 h30
  text "& <<10K 0402" at -90.49,326 h30
  text "@" at 1392.5,309.68 h30
  text "@ <<0.22uF 0402" at -44.21,293.11 h30
  text "@" at 1392.5,239.19 h30
  text "&" at 1537.11,142.82 h38
  text "&" at 1239.49,119.55 h38
  text "&" at 281.55,104.82 h38
  text "@" at 1192,94.68 h30
  text "&" at 1379.72,46.29 h38
Board Outline:
  the board outline again, w5
Fabrication Info:
  drawing of 295 lines, arcs and shapes, not listed
  text "Layer" at 2395.34,482 h60
  text "Name" at 2805.26,482 h60
  text "Material" at 3735,482 h60
  text "Thickness" at 4594.77,482 h60
  text "Constant" at 5244.6,482 h60
  text "Board Layer Stack" at 5814.46,482 h60
  text "Top Overlay" at 2805.26,362 h60
  text "Top Solder" at 2805.26,242 h60
  text "Solder Resist" at 3735,242 h60
  text "0.50mil" at 4594.77,242 h60
  text "3.8" at 5244.6,242 h60
  text "1" at 2395.34,122 h60
  text "Top Layer" at 2805.26,122 h60
  text "1.38mil" at 4594.77,122 h60
  text "Dielectric 1" at 2805.26,2 h60
  text "2313" at 3735,2 h60
  text "3.94mil" at 4594.77,2 h60
  text "4.05" at 5244.6,2 h60
  text "2" at 2395.34,-118 h60
  text "Mid Layer 1" at 2805.26,-118 h60
  text "0.69mil" at 4594.77,-118 h60
  text "Core" at 2805.26,-238 h60
  text "FR-4" at 3735,-238 h60
  text "49.80mil" at 4594.77,-238 h60
  text "4.5" at 5244.6,-238 h60
  text "3" at 2395.34,-358 h60
  text "Mid Layer 2" at 2805.26,-358 h60
  text "0.69mil" at 4594.77,-358 h60
  text "Dielectric 2" at 2805.26,-478 h60
  text "2313" at 3735,-478 h60
  text "3.94mil" at 4594.77,-478 h60
  text "4.05" at 5244.6,-478 h60
  text "4" at 2395.34,-598 h60
  text "Bottom Layer" at 2805.26,-598 h60
  text "1.38mil" at 4594.77,-598 h60
  text "Bottom Solder" at 2805.26,-718 h60
  text "Solder Resist" at 3735,-718 h60
  text "0.50mil" at 4594.77,-718 h60
  text "3.8" at 5244.6,-718 h60
  text "Bottom Overlay" at 2805.26,-838 h60
  text "Total board thickness:" at 2395.34,-958 h60
  text "62.81mil" at 4594.77,-958 h60
Drill Drawing:
  lines w10: 2388.07,1244 2388.07,1260.67 2404.74,1277.33 2388.07,1294 2388.07,1310.67 2404.74,1310.67 2421.41,1294 2438.07,1310.67 2454.74,1310.67 2454.74,1294 2438.07,1277.33 2454.74,1260.67 2454.74,1244 2438.07,1244 2421.41,1260.67 2404.74,1244 2388.07,1244 ; 2388.07,1427.33 2421.41,1394 2454.74,1427.33 2421.41,1460.67 2388.07,1427.33 ; 2388.07,1544 2421.41,1560.67 2454.74,1544 2438.07,1577.33 2454.74,1610.67 2421.41,1594 2388.07,1610.67 2404.74,1577.33 2388.07,1544 ; 2388.07,1710.67 2404.74,1710.67 2404.74,1694 2438.07,1694 2438.07,1710.67 2454.74,1710.67 2454.74,1744 2438.07,1744 2438.07,1760.67 2404.74,1760.67 2404.74,1744 2388.07,1744 2388.07,1710.67 ; 2388.07,1844 2454.74,1844 2454.74,1910.67 2388.07,1910.67 2388.07,1844 ; 2388.07,2060.67 2454.74,2060.67 2421.41,1994 2388.07,2060.67 ; 2388.07,2144 2454.74,2144 2454.74,2210.67 2388.07,2210.67 2388.07,2144 ; 2401.41,1857.33 2441.41,1857.33 2441.41,1897.33 2401.41,1897.33 2401.41,1857.33
  lines w15: 2328.28,1199 12285.5,1199 ; 2328.28,2249 12285.5,2249 ; 2879.16,1049 2879.16,2399 ; 3479,1049 3479,2399 ; 4578.68,1049 4578.68,2399 ; 5084.56,1049 5084.56,2399 ; 5818.36,1049 5818.36,2399 ; 7317.91,1049 7317.91,2399 ; 7907.76,1049 7907.76,2399 ; 8653.55,1049 8653.55,2399 ; 9793.22,1049 9793.22,2399 ; 10882.9,1049 10882.9,2399 ; 2328.28,1049 12285.5,1049 12285.5,2399 2328.28,2399 2328.28,1049
  text "Symbol" at 2418.28,2294 h72
  text "Count" at 2924.16,2294 h72
  text "Hole Size" at 3524,2294 h72
  text "Plated" at 4623.68,2294 h72
  text "Hole Type" at 5129.56,2294 h72
  text "Drill Layer Pair" at 5863.36,2294 h72
  text "Via/Pad" at 7362.91,2294 h72
  text "Pad Shape" at 7952.76,2294 h72
  text "Template" at 8698.55,2294 h72
  text "Hole Length" at 9838.22,2294 h72
  text "Routed Path Length" at 10927.9,2294 h72
  text "224" at 2924.16,2144 h60
  text "8.00mil (0.203mm)" at 3524,2144 h60
  text "PTH" at 4623.68,2144 h60
  text "Round" at 5129.56,2144 h60
  text "Top Layer - Bottom Layer" at 5863.36,2144 h60
  text "Via" at 7362.91,2144 h60
  text "Rounded" at 7952.76,2144 h60
  text "v46h20m0mx0" at 8698.55,2144 h60
  text "-" at 9838.22,2144 h60
  text "-" at 10927.9,2144 h60
  text "66" at 2924.16,1994 h60
  text "11.81mil (0.300mm)" at 3524,1994 h60
  text "PTH" at 4623.68,1994 h60
  text "Round" at 5129.56,1994 h60
  text "Top Layer - Bottom Layer" at 5863.36,1994 h60
  text "(Mixed)" at 7362.91,1994 h60
  text "Rounded" at 7952.76,1994 h60
  text "(Mixed)" at 8698.55,1994 h60
  text "-" at 9838.22,1994 h60
  text "-" at 10927.9,1994 h60
  text "2" at 2924.16,1844 h60
  text "23.62mil (0.600mm)" at 3524,1844 h60
  text "PTH" at 4623.68,1844 h60
  text "Slot" at 5129.56,1844 h60
  text "Top Layer - Bottom Layer" at 5863.36,1844 h60
  text "Pad" at 7362.91,1844 h60
  text "Rounded" at 7952.76,1844 h60
  text "r90_170h60_140r100" at 8698.55,1844 h60
  text "55.12mil (1.400mm)" at 9838.22,1844 h60
  text "31.50mil (0.800mm)" at 10927.9,1844 h60
  text "2" at 2924.16,1694 h60
  text "23.62mil (0.600mm)" at 3524,1694 h60
  text "PTH" at 4623.68,1694 h60
  text "Slot" at 5129.56,1694 h60
  text "Top Layer - Bottom Layer" at 5863.36,1694 h60
  text "Pad" at 7362.91,1694 h60
  text "Rounded" at 7952.76,1694 h60
  text "(Mixed)" at 8698.55,1694 h60
  text "66.93mil (1.700mm)" at 9838.22,1694 h60
  text "43.31mil (1.100mm)" at 10927.9,1694 h60
  text "2" at 2924.16,1544 h60
  text "24.41mil (0.620mm)" at 3524,1544 h60
  text "NPTH" at 4623.68,1544 h60
  text "Round" at 5129.56,1544 h60
  text "Top Layer - Bottom Layer" at 5863.36,1544 h60
  text "Pad" at 7362.91,1544 h60
  text "Rounded" at 7952.76,1544 h60
  text "c0hn62" at 8698.55,1544 h60
  text "-" at 9838.22,1544 h60
  text "-" at 10927.9,1544 h60
  text "2" at 2924.16,1394 h60
  text "35.43mil (0.900mm)" at 3524,1394 h60
  text "NPTH" at 4623.68,1394 h60
  text "Round" at 5129.56,1394 h60
  text "Top Layer - Bottom Layer" at 5863.36,1394 h60
  text "Pad" at 7362.91,1394 h60
  text "Rounded" at 7952.76,1394 h60
  text "c0hn90" at 8698.55,1394 h60
  text "-" at 9838.22,1394 h60
  text "-" at 10927.9,1394 h60
  text "4" at 2924.16,1244 h60
  text "37.40mil (0.950mm)" at 3524,1244 h60
  text "PTH" at 4623.68,1244 h60
  text "Round" at 5129.56,1244 h60
  text "Top Layer - Bottom Layer" at 5863.36,1244 h60
  text "Pad" at 7362.91,1244 h60
  text "(Mixed)" at 7952.76,1244 h60
  text "(Mixed)" at 8698.55,1244 h60
  text "-" at 9838.22,1244 h60
  text "-" at 10927.9,1244 h60
  text "302 Total" at 2924.16,1094 h60
  text "Slot definitions :" at 2418.28,949.03 h60
  text "Routed Path Length" at 3450.97,949.03 h60
  text "= Calculated from tool start centre position to tool end centre position." at 4553.64,949.03 h60
  text "Hole Length" at 3450.97,849.05 h60
  text "= Routed Path Length + Tool Size = Slot length as defined in the PCB layout" at 4143.77,849.05 h60

## Dimensions
-0.01,0 to 0,1574.8 on Dimension
1691.91,1299.21 to -275.59,1299.21 on Dimension

## Text inside footprints (layer, text, board x,y; h text height)
J1: Mechanical 13 "PCB Edge" at 654.31,1547.46 h31.5 r180
J4: Bottom Overlay "1" at 1550.28,1011.09 h30 r90; Mechanical 13 "PCB Edge" at 1665.84,960.64 h31.5 r90
SW1: Bottom Overlay "PCB EDGE" at -171,783.4 h12